# Altium PCB STM32H743I-EVAL2PCBDESIGN.PcbDoc (part 18 of 23)
Units mil, origin at the board's own origin, x right, y up, seen from the top; angles counter-clockwise.
Board outline 6558 x 5417 mil, 8 copper layers (L1_TOP, L2_GND, L3_HS1, L4_POWER, L5_SIG, L6_HS2, L7_GND, L8_BOTTOM), stack 61.368 mil thick; 620 components, 588 nets, 2945 pads, 1724 vias.
Unrouted connection lines stored in the file: 1.
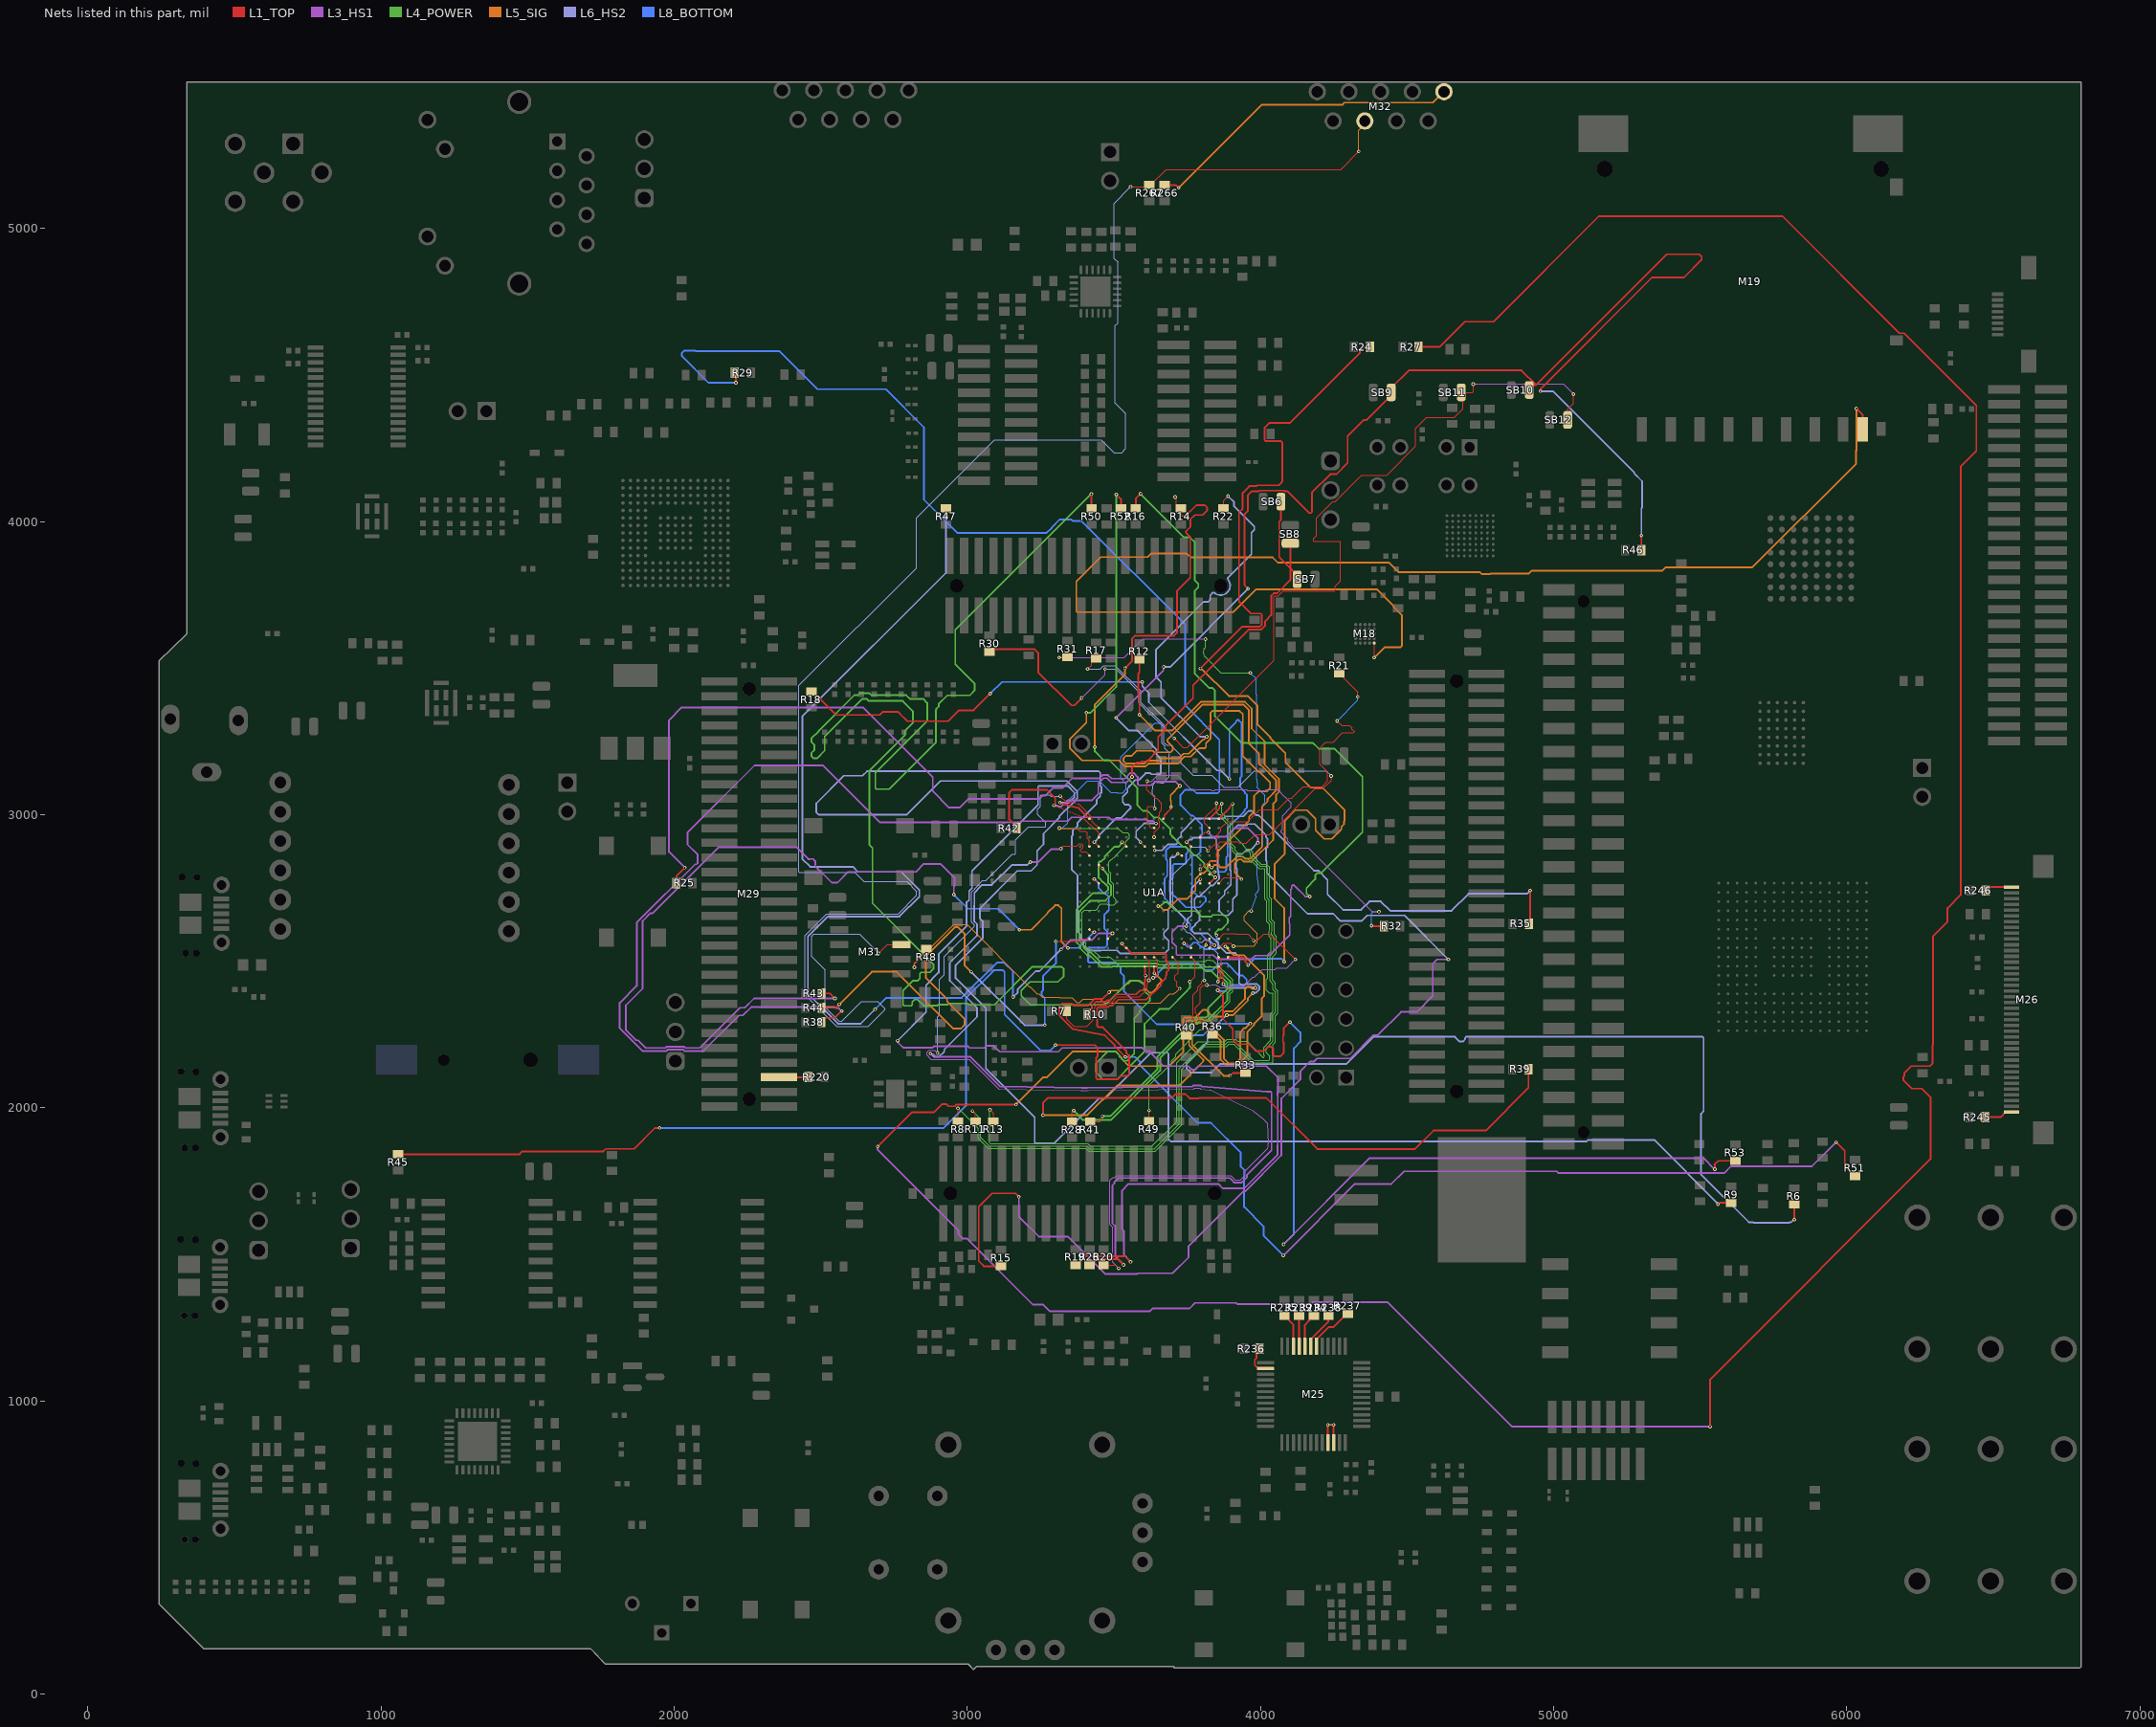
[diagram p15: the nets of this part, all layers, seen from the top]

## Via types
v1: diameter 12, hole 6, L1_TOP to L8_BOTTOM, tented both sides, 1724 vias

## Nets (pads, with @x,y where several pads share a name; then routed paths per layer and width w, separated by ;. In a path a pad name is that pad's centre, name@x,y a point inside that pad or via, vN(x,y) a via of type N, cw(c..) or ccw(c..) an arc to the next point about the centre after c; other vN are vias at no path point) (continued)
NetM18_E5: M18.E5 M19.8 | length 4704.1
  L1_TOP w2: v1(4388,3536) M18.E5@4388,3585.5
  L1_TOP w6: v1(6033,4386) 6054.27,4364.73 M19.8@6054.27,4314.24
  L5_SIG w6: v1(4388,3536) 4423,3571 4477.14,3571 4483,3576.86 4483,3680.33 4454.33,3709 4454.33,3712.19 4397.53,3769 3985,3769 3907,3691 3375.51,3691 3372,3694.51 3372,3795.85 3455.15,3879 3614.28,3879 3626.28,3891 3749,3891 3762,3878 4041.72,3878 4059.72,3860 4439.1,3860 4472.1,3827 4719.62,3827 4720.62,3828 4748.07,3828 4755.07,3821 4782.53,3821 4784.53,3823 4915.62,3823 4924.62,3832 5370.28,3832 5382.28,3844 5678.14,3844 6032,4197.86 6032,4241.62 6033,4242.62 v1(6033,4386)
NetM25_2: M25.2 R236.2 | length 104.1
  L1_TOP w6: R236.2@3997.56,1178 3986.78,1167.22 3986.78,1145.79 3980.67,1139.68 3980.67,1122.19 3990.24,1112.62 4014.49,1112.62 M25.2@4017,1110.11
NetM25_21: M25.21 M25.22 | length 139.1
  L1_TOP w6: M25.21@4229.89,857.85 v1(4229.89,917.56) ; M25.22@4249.58,857.85 v1(4249.58,917.56)
  L5_SIG w6: v1(4229.89,917.56) v1(4249.58,917.56)
NetM25_42: M25.42 R237.2 | length 168.5
  L1_TOP w6: M25.42@4192,1184.72 M25.42@4191.02,1185.7 4191.02,1209.52 4198.19,1216.69 4198.19,1217.12 4232.46,1251.39 4249.01,1251.39 4294.06,1296.44 R237.2@4298,1296.44
NetM25_43: M25.43 R238.2 | length 128.9
  L1_TOP w6: M25.43@4171.33,1185.7 4171.33,1209.52 4178.5,1216.69 4178.5,1217.12 4231.56,1270.18 4231.56,1289 R238.2@4232,1289.44
NetM25_44: M25.44 R234.2 | length 118.6
  L1_TOP w6: M25.44@4151.65,1185.7 4151.65,1259.09 4167.28,1274.72 4167.28,1278.66 4178.06,1289.44 R234.2@4182,1289.44
NetM25_45: M25.45 R239.2 | length 103.8
  L1_TOP w6: M25.45@4131.96,1185.7 R239.2@4132,1289.44 R239.2@4132,1289.44
NetM25_46: M25.46 R235.2 | length 118.6
  L1_TOP w6: R235.2@4082,1289.44 4085.94,1289.44 4096.72,1278.66 4096.72,1274.72 4112.28,1259.17 M25.46@4112.28,1185.7
NetM26_1: M26.1 R245.2 | length 96.7
  L1_TOP w6: R245.2@6472.56,1968 6525.28,1968 6542.42,1985.14 M26.1@6562.11,1985.14
NetM26_40: M26.40 R246.1 | length 92.1
  L1_TOP w6: R246.1@6475.56,2741 6475.56,2742.08 6486.34,2752.86 M26.40@6562.11,2752.86
NetM29_05: M29.05 R220.2 | length 100.4
  L1_TOP w6: M29.05@2357.5,2104 2456.44,2104 R220.2@2457.44,2105
NetM31_7: M31.7 M32.7 R267.2 | length 6401.5
  L1_TOP w4: v1(2697,2527) 2727,2557 M31.7@2775.3,2557 ; v1(3557,5142) 3614.44,5142 R267.2@3621,5148.56 3624.94,5148.56 3678.29,5201.91 4273.91,5201.91 v1(4335.31,5263.31)
  L5_SIG w4: v1(4335.31,5263.31) 4335.31,5334.41 4355.98,5355.08 M32.7@4355.98,5367
  L6_HS2 w4: v1(2697,2527) 2632,2592 2476.03,2592 2469,2584.97 2469,2515.97 2515.51,2469.46 2515.51,2342.51 2562.03,2296 2571.97,2296 2638.97,2363 2694.73,2363 2719,2338.73 2719,2335.41 2661.59,2278 2554.57,2278 2447,2385.57 2447,2588.43 2520.23,2661.66 2764.65,2661.66 2827.34,2724.35 2827.34,2738.43 2793.88,2771.89 2647,2771.89 2615.89,2803 2427.34,2803 2425,2805.34 2425,3441 2826,3842 2826,4012.67 3092.33,4279 3456,4279 3500,4235 3526.31,4235 3540,4248.69 3540,4369.31 3504,4405.31 3504,4668.66 3513,4677.66 3513,4885.28 3500,4898.28 3500,5085 v1(3557,5142)
NetM32_5: M32.5 R266.2 | length 1092.9
  L1_TOP w6: R266.2@3673,5148.56 3711.44,5148.56 v1(3721,5139)
  L5_SIG w6: v1(3721,5139) 4004,5422 4278.94,5422 4286.44,5429.5 4588.56,5429.5 M32.5@4626.06,5467
NetR6_1: R6.1 U1A.D13 | length 4025.8
  L1_TOP w2: v1(3748.03,2906.46) U1A.D13@3763,2891.49
  L1_TOP w6: v1(5821,1618) R6.1@5821,1669.88
  L5_SIG w6: v1(3885,2316) 3906.76,2316 3957,2366.24 3957,2374 v1(3974,2391)
  L6_HS2 w6: v1(3748.03,2906.46) 3749.65,2906.46 3758.65,2915.46 3765.6,2915.46 3772.14,2922 3842.38,2922 3850,2914.38 3850,2884.31 3853.96,2880.35 3853.96,2812.42 3856.48,2809.9 3856.48,2793.9 3859,2791.38 3859,2780.62 3836.38,2758 3829.62,2758 3792.5,2720.88 3783.5,2720.88 3775,2712.38 3775,2681.47 3792,2664.47 3792,2640.62 3777.62,2626.23 3777.62,2624 3767,2613.38 3767,2602.62 3774.62,2595 3820.38,2595 3856,2559.38 3856,2555.62 3883.62,2528 3914.33,2528 3928,2514.33 3928,2444.62 3927,2443.62 3927,2426.62 3934.62,2419 3947.06,2419 3950.06,2422 3988.38,2422 3996,2414.38 3996,2403.62 3984.53,2392.15 3975.15,2392.15 v1(3974,2391) ; v1(3885,2316) 3819,2250 3819,2223.53 3748,2152.53 3748,2133.47 3761.47,2120 3832.96,2120 3861.96,2149 3894.62,2149 4293,2149 4386,2242 4663.62,2242 4679.62,2226 4690.38,2226 4698,2233.62 4698,2238.49 4701.51,2242 5508.49,2242 5512,2238.49 5512,1988.14 5503,1979.14 5503,1772.14 5666.14,1609 5680.86,1609 5681.86,1608 5802.77,1608 5803.77,1609 5810.38,1609 5819.38,1618 v1(5821,1618)
NetR7_2: R7.2 U1A.T8 | length 515.4
  L1_TOP w4: R7.2@3339.56,2330 3339.56,2301.44 3363,2278 3407.42,2278 3428.22,2298.8 3428.22,2329.99 3433.78,2335.55 3433.78,2343.34 3443.15,2352.72 3468.61,2352.72 3476.87,2352.72 3482.15,2358 3490.11,2358 3510.11,2378 3587.11,2378 3613,2403.89 3613,2422.97 3622.01,2431.99 3625.03,2435 ; U1A.T8@3605.52,2513.54 3621.56,2497.5 3621.56,2468.61 3622,2468.17 3622,2438.03 3625.03,2435 ; v1(3619,2435) 3625.03,2435
NetR8_1: R8.1 U1A.A16 | length 2540.8
  L1_TOP w4: R8.1@2968,1953.56 v1(2968,1998)
  L1_TOP w6: U1A.A16@3857.49,2985.98 3894.03,3022.52 3894.03,3026.03 v1(3905,3037)
  L4_POWER w4: v1(2968,1998) 3036.66,1929.34 3036.66,1895.34 3071,1861 3404.04,1861 3413.38,1851.66 3640.94,1851.66 3731,1941.72 3731,2131.28 3808.72,2209 3884.57,2209 3892.57,2217 3908.31,2217 3972.31,2153 4040,2153 4043.41,2156.41 4043.41,2215.81 4051,2223.4 4051,2313.71 4059.15,2321.86 4059.15,2398.17 4051.15,2406.17 4051.15,2425.15 4041,2435.3 4041,2514.57 4054.5,2528.07 4054.5,2585.01 4048,2591.52 4048,2631.74 4038,2641.74 4038,2711.78 4031,2718.78 4031,2820.72 4020.06,2831.66 4002.31,2831.66 3974,2859.97 3974,2871.28 3962.28,2883 3952.03,2883 3940.78,2894.25 3940.78,2896.23 3905,2932.01 3905,2943.92 3906,2944.92 3906,2973.08 3905,2974.08 v1(3905,3037)
NetR9_1: R9.1 U1A.E12 | length 7750.2
  L1_TOP w4: v1(3718,2867) 3719.53,2865.47 3724.71,2865.47 3730.19,2859.99 U1A.E12@3731.5,2859.99
  L1_TOP w6: v1(5561,1671) 5562.62,1671 5567.51,1675.88 R9.1@5606,1675.88
  L6_HS2 w6: v1(3718,2867) 3706.12,2855.12 3697.21,2855.12 3692.04,2849.94 3692.04,2684.65 3685,2677.62 3685,2612.45 3670.48,2597.93 3670.48,2586.11 3687.01,2569.58 3687.01,2540.99 3673.02,2527 3520.28,2527 3510.28,2537 3455.09,2537 3454.09,2536 3413.86,2536 3396,2553.86 3396,2566.95 3386.05,2576.91 3386.05,2590.31 3376,2600.36 3376,2792.53 3356.51,2812.01 3356.51,2927.32 3360,2930.81 3360,2946.14 3376,2962.14 3376,2972.28 3441,3037.28 3441,3050.47 3453.51,3062.99 3453.51,3071.99 3457,3075.47 3457,3094.53 3453.51,3098.01 3453.51,3142.97 3448.09,3148.4 2658.12,3148.4 2642.72,3133 2579,3133 2485,3039 2485,3007.62 2492.62,3000 2793.84,3000 2908.84,3115 3339.14,3115 3365,3089.14 3375,3079.14 3375,3055.47 3365,3045.47 3313.62,2994.09 3313.62,2989 3260,2935.39 3260,2898.81 3238,2876.81 3238,2828.47 3217.53,2808 3170.19,2808 3043,2680.81 3043,2645.19 3053,2635.19 3053,2578.95 2960,2485.95 2960,2442.05 3063,2339.05 3063,2134 3229.51,1967.49 3229.51,1878.99 3296.99,1878.99 3449,2031 3469.47,2031 3626.47,2188 3682.49,2188 3686,2184.49 3686,1893.51 3694.51,1885 5112.4,1885 5117.48,1890.08 5343.06,1890.08 5561,1672.14 v1(5561,1671)
NetR10_2: R10.2 U1A.U8 | length 316.2
  L1_TOP w6: R10.2@3408.44,2319 3408.44,2322.94 3424.78,2339.28 3424.78,2347.07 3439.42,2361.72 3464.88,2361.72 3473.14,2361.72 3478.43,2367 3486.38,2367 3506.38,2387 3576.38,2387 3589.38,2400 3596.38,2400 3604,2407.62 3604,2427.38 3606,2429.38 3606,2440.38 3606.85,2441.24 3606.85,2449.85 v1(3608,2451) 3608,2452.62 3605.52,2455.1 U1A.U8@3605.52,2482.04
NetR11_1: R11.1 U1A.A15 | length 2526
  L1_TOP w4: v1(3018,1989) 3028,1979 R11.1@3028,1953.56
  L1_TOP w6: U1A.A15@3825.99,2985.98 3859.85,3019.84 3859.85,3029.23 v1(3868,3037.38)
  L4_POWER w4: v1(3018,1989) 3046,1961 3046,1900 3044.66,1898.66 3074.31,1869 3407.36,1869 3416.01,1860.34 3638.31,1860.34 3723,1945.03 3723,2134.6 3805.4,2217 3881.26,2217 3889.26,2225 3911.63,2225 3975.63,2161 4028.69,2161 4031.03,2163.34 4031.03,2175.64 4019,2187.67 4019,2202.72 4043,2226.72 4043,2317.02 4051.15,2325.17 4051.15,2394.85 4043.15,2402.85 4043.15,2421.83 4033,2431.98 4033,2517.88 4046.5,2531.38 4046.5,2581.7 4038,2590.2 4038,2599.57 4040,2601.57 4040,2628.43 4030,2638.43 4030,2708.47 4023,2715.47 4023,2817.4 4016.75,2823.66 3999,2823.66 3966,2856.66 3966,2867.97 3958.97,2875 3946.14,2875 3938.13,2866.99 3925.29,2866.99 3914.01,2878.28 3914.01,2888.56 3898.03,2904.53 3898.03,2923.31 3897,2924.34 3897,2947.23 3898,2948.23 3898,2969.77 3881.5,2986.27 3881.5,2992.77 3868,3006.27 v1(3868,3037.38)
NetR12_2: R12.2 U1A.H16 | length 1463.3
  L1_TOP w4: U1A.H16@3857.49,2765.5 3876.49,2784.51 3928.33,2784.51 3932.84,2780 v1(3935,2780)
  L1_TOP w6: v1(3587,3341) 3587,3409.88 3583,3413.88 3583,3481.14 3587,3485.14 R12.2@3587,3529.44
  L5_SIG w6: v1(3587,3341) 3641,3287 3698.86,3287 3796.86,3385 3947.14,3385 3970,3362.14 3970,3293.76 4014,3249.76 4014,3170.95 4063,3121.95 4063,3078.05 4053,3068.05 4053,3046.38 4043,3036.38 4043,2913.3 3969.7,2840 3942.38,2840 3935.38,2847 3924.62,2847 3912.22,2834.61 3912.22,2802.78 v1(3935,2780)
NetR13_1: R13.1 U1A.B15 | length 2515.1
  L1_TOP w4: v1(3077,1993) 3089,1981 R13.1@3089,1953.56 ; U1A.B15@3825.99,2954.48 3809.95,2970.52 3809.95,2988.71 3848.47,3027.22 3848.47,3037.47 v1(3850,3039)
  L4_POWER w4: v1(3077,1993) 3077,1880 3080,1877 3410.67,1877 3418.67,1869 3630,1869 3714,1953 3714,2153 3786,2225 3877.95,2225 3885.95,2233 3915.69,2233 3921.69,2227 3954.97,2227 4000.33,2181.64 4000.33,2179.36 4007.69,2172 4011,2172 4013.34,2174.34 4013.34,2177.66 4011,2180 4011,2206.03 4035,2230.03 4035,2320.34 4043.15,2328.49 4043.15,2389.19 4040.8,2391.54 4029.49,2391.54 4019.15,2401.88 4019.15,2438.01 4024,2442.87 4024,2522.63 4036,2534.63 4036,2578.25 4030,2584.26 4030,2602.89 4032,2604.89 4032,2625.11 4022,2635.11 4022,2705.16 4015,2712.16 4015,2813.31 4012.66,2815.66 3995.69,2815.66 3972.34,2839 3967.11,2839 3955.11,2851 3949.03,2851 3944.03,2856 3935.76,2856 3932.76,2858.99 3921.98,2858.99 3906.01,2874.96 3906.01,2885.25 3890.03,2901.22 3890.03,2919.99 3889,2921.03 3889,2950.54 3890,2951.54 3890,2966.46 3873.5,2982.96 3873.5,2989.46 3862.96,3000 3856.46,3000 3850,3006.46 v1(3850,3039)
NetR14_2: R14.2 U1A.H15 | length 1947
  L1_TOP w4: v1(3709,4084) 3709,4081.84 3712.28,4078.55 3712.28,4057.34 3724.06,4045.56 R14.2@3728,4045.56
  L1_TOP w6: v1(3537.82,3499.82) 3562.28,3524.28 3562.28,3601.24 3571.96,3610.92 3705.32,3610.92 3715,3620.6 3715,3763.38 3760,3808.38 3760,3947.42 3746.82,3960.59 3746.82,3967.87 3761,3982.05 3761,4007.38 3776.12,4022.5 3802.88,4022.5 3818,4037.62 3818,4048.38 3810.38,4056 3781.33,4056 3744.6,4019.26 3731.51,4019.26 3728,4022.78 R14.2@3728,4045.56 ; U1A.H15@3825.99,2765.5 3825.99,2765.75 3846,2785.76 v1(3846,2786)
  L4_POWER w6: v1(3434.78,3230.81) 3434.81,3215.81 3464.58,3186.03 3484.35,3186.03 3580,3090.38 3580,3031.86 3598.86,3013 3614.84,3013 3636.84,2991 3652.7,2991 3693,2950.7 3693,2932.62 3735.62,2890 3745.5,2890 3773.54,2861.96 3779.42,2861.96 3808.52,2832.86 3808.52,2822.72 3830,2801.24 3830,2799.62 3837.62,2792 3839.49,2792 3845.49,2786 v1(3846,2786)
  L5_SIG w6: v1(3434.78,3230.81) 3434.78,3375.78 3537.82,3478.82 v1(3537.82,3499.82)
NetR15_1: R15.1 U1A.C14 | length 4629.7
  L1_TOP w2: U1A.C14@3794.5,2922.98 3811.51,2940 v1(3822,2940)
  L1_TOP w6: R15.1@3115,1459.44 3056.41,1459.44 3039,1476.85 3039,1662.41 3084.59,1708 3164,1708 v1(3176,1696)
  L3_HS1 w6: v1(3176,1696) 3176,1628 3243.52,1560.48 3342.52,1560.48 3470,1433 3580.29,1433 3582.29,1435 3700,1435 3755,1490 3755,1528.38 3941.62,1715 3948.27,1715 4071.25,1837.98 4071.25,2031.75 4137,2097.5 4137,2125.78 4169.22,2158 4183.36,2158 4193.36,2168 4306.5,2168 4386,2247.5 4400.02,2247.5 4479.52,2327 4533.38,2327 4588,2381.62 4588,2491.38 4602.44,2505.83 v1(4641,2505.83) ; v1(3822,2940) 3822,2938.53 3835.58,2924.95 3881.94,2924.95 3910.81,2953.83 3957.17,2953.83 3991,2920 v1(3991,2904)
  L6_HS2 w6: v1(3991,2904) 3965.73,2878.73 3951.11,2878.73 3938.38,2865.99 3920.51,2865.99 3917,2862.48 3917,2818.24 3919,2816.24 3919,2725.03 3905.78,2711.81 3905.78,2672.64 3889.14,2656 3874.95,2656 3859,2671.95 3859,2708.19 3878,2727.19 3878,2739 3899,2760 3899,2807.95 3897,2809.95 3897,2938.48 3922.51,2963.99 3953.24,2963.99 3957.25,2968 3981.14,2968 4019,2930.14 4019,2922.67 4024,2917.67 4024,2890.33 4019,2885.33 4019,2842.47 4021.37,2840.1 4021.37,2801.1 4160.47,2662 4247.72,2662 4271.72,2638 4346.28,2638 4364.28,2656 4490.83,2656 v1(4641,2505.83)
NetR16_2: R16.2 U1A.H14 | length 3048.8
  L1_TOP w2: U1A.H14@3794.5,2765.5 3794.75,2765.76 3794.75,2778.75 v1(3795,2779)
  L1_TOP w6: R16.2@3574,4045.56 3575,4046.56 3575,4079 v1(3591,4095)
  L3_HS1 w6: v1(3747,2619) 3717.62,2619 3698,2599.38 3698,2565.42 3713.01,2550.42 3713.01,2524.51 3716.52,2521 3838.64,2521 3852.64,2507 3969.81,2507 3981.81,2519 4030,2519 4100,2589 4100,2627.47 4098,2629.47 4098,2648.53 4103,2653.53 4103,2744.38 4106.14,2747.53 4106.14,2755.86 4109.66,2759.37 4114.63,2759.37 4153.35,2720.65 v1(4168.35,2720.65)
  L4_POWER w6: v1(3591,4095) 3739.54,3946.46 3759.04,3946.46 3776,3929.5 3776,3798.89 3788,3786.89 3788,3776.12 3776,3764.12 3776,3481 3825,3432 3836.38,3432 3844,3424.38 3844,3336.62 3935.62,3245 4178.86,3245 4198.52,3225.33 4252.19,3225.33 4348,3129.53 4348,2941 4208,2801 4194.62,2801 4187,2793.38 4187,2780 4157,2750 4157,2732 v1(4168.35,2720.65)
  L6_HS2 w6: v1(3747,2619) 3748.15,2620.15 3748.15,2627.45 3751,2630.3 3751,2642.61 3765,2656.62 3765,2749 v1(3795,2779)
NetR17_2: R17.2 U1A.G14 | length 1803.3
  L1_TOP w2: v1(3410,3497) 3423.28,3510.28 3423.28,3519.66 3436.06,3532.44 R17.2@3440,3532.44 ; U1A.G14@3794.5,2797 3794.75,2797.25 3794.75,2813.75 v1(3795,2814) 3795.56,2814 3803.04,2821.48 3803.62,2822.07 3831.35,2840.11 3831.84,2840.43 3832.52,2840.43 3849.88,2839.03 3850.79,2839.03 3851.37,2839.62 3851.96,2840.2 3851.96,2853.18 3850.49,2854.66 3850.49,2868.93 3851.96,2870.4 3851.96,2881.04 3848,2885 3848,2891.9 3863.59,2907.49 3924.48,2907.49 3928.97,2903 3952.04,2903 3981.87,2932.83 4030.9,2932.83 4187.07,3089 4213.15,3089 4241,3116.85 v1(4241,3132.19)
  L6_HS2 w2: v1(3410,3497) 3453.17,3497 3464.17,3508 3504.63,3508 3591.53,3421.1 3591.53,3382.91 3625.95,3348.49 3628.55,3348.49 3671,3306.04 3671,3246 3680,3237 3692.56,3237 3728.53,3201.03 3728.53,3175.91 3769.99,3134.46 3833.54,3134.46 3875,3093 3923.11,3093 3979.11,3149 4224.19,3149 v1(4241,3132.19)
NetR18_2: R18.2 U1A.G15 | length 2534.2
  L1_TOP w2: U1A.G15@3825.99,2797 3833.99,2805 v1(3843,2805)
  L1_TOP w6: R18.2@2468,3420.56 2471.94,3420.56 2552.18,3340.31 2701.42,3340.31 2712.11,3351 2762.62,3351 2781.62,3332 2782,3332 2795,3319 2934.38,3319 2971.55,3356.17 3021.17,3356.17 v1(3078,3413)
  L6_HS2 w6: v1(3596,3453) 3597,3452 3597,3438 3619,3416 3619,3383.38 3851.38,3151 3865,3151 v1(3894,3122)
  L8_BOTTOM w6: v1(3078,3413) 3118,3453 v1(3596,3453) ; v1(3843,2805) 3877.3,2805 3883.12,2810.83 3883.12,2814.41 3883,2814.53 3883,2853.47 3887.78,2858.25 3887.78,2954.47 3946.01,3012.69 3946.01,3016.99 3954.01,3024.99 3954.01,3066.9 3947,3073.9 3947,3077.65 3930.81,3093.85 3930.81,3126.15 3936,3131.35 3936,3312.38 3925.49,3322.9 3920.51,3322.9 3917,3319.38 3917,3316.38 3894,3293.38 v1(3894,3122)
NetR19_1: R19.1 U1A.A2 | length 4097.6
  L1_TOP w6: v1(3316,3041) 3333.3,3034 3379.52,3023 3380.62,3021.9 U1A.A2@3416.54,2985.98 ; R19.1@3369,1462.44 3372.94,1462.44 3403.72,1493.22 3537.78,1493.22 v1(3557,1474)
  L3_HS1 w6: v1(2762,2229) 2763.15,2227.85 2763.15,2222.85 2771.26,2214.74 2781,2205 2881.81,2205 2886.81,2210 3001.76,2210 3007.76,2204 3057.67,2204 3064.67,2211 3090,2211 3110,2191 3310.53,2191 3323.53,2204 3502.75,2204 3503.75,2205 3595.19,2205 3607.19,2193 3620.53,2193 3658,2155.53 3658,2153.28 3669.28,2142 3753.62,2142 3765.62,2130 3776.38,2130 3788.38,2142 4020.14,2142 4060,2102.14 4060,2054.33 4058,2052.33 4058,2043.6 4059,2042.6 4059,1871.4 4058,1870.4 4058,1838.88 3944.12,1725 3871.35,1725 3856.43,1739.92 3550.31,1739.92 3528,1717.61 3528,1586 3534.43,1579.57 3534.43,1496.57 v1(3557,1474)
  L6_HS2 w6: v1(2762,2229) 2859,2326 2859,2418.62 2902,2461.62 2902,2523.62 2997,2618.62 2997,2699.86 3006,2708.86 3006,2739.98 3016,2749.98 3016,2807.7 3241,3032.7 3241,3094.49 3244.51,3098 3342,3098 3365,3075 3365,3059.62 3346.38,3041 v1(3316,3041)
NetR20_1: R20.1 U1A.B3 | length 3707.5
  L1_TOP w4: v1(3317,3063) 3337.03,3043 3346.97,3043 3353.06,3043.9 3355.33,3043.91 3377.81,3036.8 cw(c3376.61,3032.98) 3379.41,3035.83 ; 3379.44,3035.81 3425.54,2989.7 3425.54,2976.98 U1A.B3@3448.04,2954.48 ; R20.1@3465,1462.44 3505.56,1462.44 v1(3516,1452)
  L3_HS1 w4: v1(2898,2187) 2889,2196 2869.03,2196 2862,2188.97 2862,2179.03 2876.03,2165 3005.75,2165 3092.73,2078.01 3106.75,2064 3385.75,2059 3412.25,2059 3771.89,2064 3774.89,2067 3793.11,2067 3796.11,2064 3827.73,2061 3829.73,2060.67 3973.7,1990.98 3975.67,1989.42 4010.25,1960.14 4023.14,1947.25 4026,1877.7 4026,1865.27 4024.83,1860.86 3945,1781.03 3945,1766.89 3932.11,1754 3913.89,1754 3898.97,1768.92 3511.05,1768.92 3503.13,1761 3495.34,1761 3486,1751.66 3486,1601.13 3496,1591.13 3496,1472.73 3516,1452.73 v1(3516,1452)
  L6_HS2 w4: v1(2898,2187) 2898,2309.96 2905,2316.96 2905,2437.75 2921,2453.75 2921,2515.75 3024,2618.75 3024,2623.18 3014,2633.18 3014,2704.14 3015,2705.14 3015,2736.26 3025,2746.25 3025,2748.25 3051.75,2775 3062.97,2775 3152.97,2865 3162.66,2865 3165,2867.34 3165,2914.97 3208.03,2958 3265.03,2958 3267,2959.97 3267,2972.33 3239,3000.33 3239,3017.97 3250,3028.97 3250,3064.66 3252.34,3067 3281.59,3067 3285.59,3063 v1(3317,3063)
NetR21_1: R21.1 U1A.U16 | length 1795
  L1_TOP w4: v1(3821.16,2877) 3828.22,2884.06 3829.07,2884.06 3849.49,2904.48 3849.49,2929.51 3865.49,2945.51 3865.49,2955.03 3887.44,2976.98 3956.71,2976.98 3996.73,3017 4059.03,3017 4098.53,3056.5 4105.5,3056.5 4145,3096 4210.25,3096 4229,3114.75 4229,3145.91 4203,3171.91 4203,3228.09 4222.76,3247.85 4248.78,3247.85 4279.93,3279 4317,3279 4319.34,3281.34 4319.34,3284.66 4312,3292 4312,3295.97 4304.37,3303.6 4277.4,3303.6 v1(4261.33,3319.67) ; R21.1@4269,3481.44 4272.94,3481.44 4284.72,3469.66 4284.72,3465.72 4332,3418.44 v1(4332,3402)
  L1_TOP w6: v1(3855,2430) 3855,2431.62 3857.49,2434.11 3857.49,2436.73 3863.72,2442.96 3863.72,2457.04 3857.49,2463.27 U1A.U16@3857.49,2482.04
  L6_HS2 w4: v1(3821.16,2877) 3814.03,2884.14 3814.03,2886.17 3811.2,2889 3764.34,2889 3762,2886.66 3762,2854.44 3702,2794.44 3702,2687.03 3742,2647.03 3742,2634.03 3739.15,2631.18 3735,2627.03 3735,2614.03 3751.27,2597.76 3758.73,2597.76 3775,2581.5 3775,2579.05 3789.53,2564.53 3800.68,2564.53 3808.5,2572.34 3819.66,2572.34 3831,2561 3831,2549.03 3855,2525.03 v1(3855,2430)
  L8_BOTTOM w4: v1(4261.33,3319.67) 4332,3390.34 v1(4332,3402)
NetR22_2: R22.2 U1A.F15 | length 2825.6
  L1_TOP w2: U1A.F15@3825.99,2828.5 3825.99,2827.75 3833,2820.74 v1(3833,2820)
  L1_TOP w4: R22.2@3874,4045.56 3874,4072 v1(3889,4087)
  L5_SIG w6: v1(3817,3266) 3806.39,3255.39 3802.15,3255.39 3754.76,3208 3737.19,3208 3722.19,3193 3661.43,3193 3652.43,3184 3613.53,3184 3604.53,3175 3540.62,3175 3533,3182.62 3533,3193.38 3540.62,3201 3560.62,3201 3577.62,3218 3633,3218 3638,3213 3693.38,3213 3701,3220.62 3701,3231.38 3681.68,3250.71 3681.68,3255.68 3801,3375 3943,3375 3960,3358 3960,3243.67 3994,3209.67 3994,3173.49 3997.7,3169.79 4001.02,3169.79 4053,3117.81 4053,3082.19 4027.81,3057 4027.51,3057 4024,3053.49 4024,3045.62 4005,3026.62 4005,2889.45 3965.55,2850 3946.53,2850 3939.53,2857 3919.7,2857 3883.16,2820.46 3862.66,2820.46 3855.13,2828 3842.62,2828 3834.62,2820 v1(3833,2820)
  L6_HS2 w6: v1(3817,3266) 3794,3266 3660.51,3399.49 3660.51,3452.21 3644,3468.73 3644,3564 3806.29,3726.29 3810.33,3726.29 3810.62,3726 3821.38,3726 3829,3733.62 3829,3744.38 3828.71,3744.67 3828.71,3748.71 3837.5,3757.5 3839.99,3757.5 3842.2,3757.5 ccw(c3864,3781.5) 3892.66,3796.67 3888.5,3804.53 3888.5,3808.5 3969,3889 3969,3962.62 3979,3972.62 3979,3983.38 3909.86,4052.52 3909.86,4066.14 v1(3889,4087)
NetR24_1: R24.1 U1A.T17 | length 3482.6
  L1_TOP w6: v1(3795,3499) 3937.22,3641.22 3997.06,3641.22 4004.72,3648.88 4004.72,3682.24 4000.62,3686.34 3967.26,3686.34 3927,3726.6 3927,4031.71 3939.31,4044.02 3939.31,4098.15 3962.16,4121 3986.04,4121 3989.04,4124 4062.14,4124 4073,4134.86 4073,4136.27 4074,4137.27 4074,4270.77 4070.49,4274.28 4017.88,4274.28 4013.78,4278.38 4013.78,4319.62 4031.16,4337 4100.84,4337 4339.22,4575.38 4339.22,4583.22 4352,4596 R24.1@4373.56,4596 ; U1A.T17@3888.98,2513.54 3939.46,2513.54 3949.27,2503.73 3949.27,2497.35 3958,2488.62 v1(3958,2487)
  L5_SIG w6: v1(3795,3499) 3796.62,3499 3799.62,3496 3801.14,3496 3892.14,3405 3951,3405 3956.14,3405 3990,3371.14 3990,3366 3990,3307.14 4034,3263.14 4034,3260 4085,3209 4085,3178.33 4170.33,3093 4210,3093 4286.22,3016.78 4286.22,2977.95 4284.54,2976.28 4284.54,2967.28 4276.22,2958.95 4276.22,2950.17 4243.37,2917.33 4216.91,2917.33 4187.79,2946.45 4187.79,2986.63 4159.09,3015.33 4118.49,3015.33 4083,2979.85 4083,2866.14 4048,2831.14 4048,2714.15 4081,2681.15 v1(4081,2498)
  L8_BOTTOM w6: v1(3958,2487) 3980,2509 4070,2509 v1(4081,2498)
NetR25_2: R25.2 U1A.A10 | length 2758.5
  L1_TOP w6: R25.2@2007.44,2767 2007.44,2790.44 v1(2036,2819) ; U1A.A10@3668.51,2985.98 3672.01,2989.47 3672.01,2997.57 3693.85,3019.42 3693.85,3025.85 v1(3695,3027)
  L3_HS1 w6: v1(2036,2819) 1982,2873 1982,3322.38 2025.62,3366 2643.86,3366 2882,3127.86 2882,3080.19 2938.19,3024 2973.81,3024 3003.81,3054 3245.33,3054 3256.33,3065 3266.28,3065 3292.28,3091 3324.62,3091 3357.62,3124 3449.86,3124 3460.86,3135 3479.91,3135 3491.91,3123 3537.62,3123 3556.62,3142 3567.38,3142 3581,3128.38 3581,3104 3585,3100 3626.62,3100 3638.62,3112 3711,3112 v1(3725,3098)
  L5_SIG w6: v1(3695,3027) 3695,3046.39 3693.07,3048.31 3693.07,3066.07 v1(3725,3098)
NetR26_1: R26.1 U1A.E2 | length 3674.5
  L1_TOP w4: v1(3319,2884) 3327.66,2892.66 3373.49,2892.66 3381.31,2900.48 3388.77,2900.48 3394.04,2895.21 3394.04,2887.75 3385.94,2879.66 3385.94,2876.34 3388.29,2874 3404.97,2874 3412,2866.97 3412,2864.76 3416.54,2860.22 U1A.E2@3416.54,2859.99
  L1_TOP w6: R26.1@3417,1462.44 3420.94,1462.44 3441.5,1483 3444.47,1483 3444.69,1483.22 3513.78,1483.22 v1(3533,1464)
  L3_HS1 w6: v1(2874,2184) 2875,2183 2883.61,2183 2892.62,2174 3009.47,2174 3095.21,2088.27 3108.72,2074.76 3110.47,2073 3389.47,2068 3408.53,2068 3768.16,2073 3771.16,2076 3796.84,2076 3799.84,2073 4021.62,2055 4034.49,2055 4038,2051.49 4038,1855 3954,1771 3954,1763.16 3935.84,1745 3910.16,1745 3895.24,1759.92 3514.78,1759.92 3501.81,1746.95 3501.81,1742.33 3495,1735.52 3495,1604.86 3505,1594.86 3505,1492 v1(3533,1464) ; v1(3215,2838) 3241.62,2838 3285.62,2882 3304.57,2882 3305.42,2882.85 3317.85,2882.85 v1(3319,2884)
  L6_HS2 w6: v1(2874,2184) 2875.21,2184 2885.21,2174 2903.38,2174 2921,2191.62 2921,2198.38 3033,2310.38 3033,2340.76 2940,2433.76 2940,2494.24 3033,2587.24 3033,2626.9 3023,2636.9 3023,2689.1 3024,2690.1 3024,2732.53 3034,2742.53 3034,2744.53 3049.47,2760 3083.42,2760 3151.42,2828 3203.79,2828 3213.79,2838 v1(3215,2838)
NetR27_1: R27.1 U1A.T16 | length 11523.8
  L1_TOP w4: U1A.T16@3857.49,2513.54 3866.49,2504.54 3866.49,2467 3872.72,2460.77 3872.72,2454.17 3873.53,2453.36 v1(3873.53,2422.02)
  L1_TOP w6: v1(2694,1868) 2810.33,1984.33 2885.95,1984.33 2913.62,2012 2929.47,2012 2936.47,2005 2956.62,2005 2962.62,2011 v1(3166,2011) ; R27.1@4539.56,4596 4611.05,4596 4697.05,4682 4795,4682 5155,5042 5781,5042 6180.11,4642.89 6195.36,4642.89 6442.05,4396.2 6442.05,4241.05 6389,4188 6389,2726 6344,2681 6344,2634.67 6294,2584.67 6294,2216 6293.2,2215.2 6293.2,2152.19 6283.25,2142.24 6220.24,2142.24 6196.28,2118.28 6196.28,2108.67 6193,2105.38 6193,2094.62 6222.31,2065.31 6256.69,2065.31 6286,2036 6286,1824.86 5534,1072.86 v1(5534,911.54)
  L3_HS1 w6: v1(2694,1868) 2694,1857 2969,1582 2969,1568.47 2983.47,1554 2998,1554 3224,1328 3258.62,1328 3281.62,1305 3443.53,1305 3444.53,1306 3623,1306 3632,1315 3757.76,1315 3776.76,1334 3916.33,1334 3920.33,1330 4173.17,1330 4180.17,1337 4433,1337 4858.46,911.54 v1(5534,911.54)
  L5_SIG w6: v1(3166,2011) 3259,2104 3272.12,2104 3360.12,2192 3505.38,2192 3526,2171.38 3526,2167.62 3551.62,2142 3688.53,2142 3737,2190.47 3737,2304.49 3740.51,2308 3778.33,2308 3790.97,2320.64 3790.97,2321.36 3803.62,2334 3814.38,2334 3837.77,2310.62 3868.49,2310.62 3872,2314.13 3872,2321.38 3879.62,2329 3905.62,2329 3947,2370.39 3947,2404.38 3954.62,2412 3965.38,2412 3971.51,2405.87 3978.25,2405.87 3981.38,2409 v1(3983,2409)
  L6_HS2 w6: v1(3873.53,2422.02) 3886.54,2409 3951.2,2409 3954.2,2412 3966.38,2412 3968.23,2410.15 3981.85,2410.15 v1(3983,2409)
NetR28_1: R28.1 U1A.F3 | length 1770
  L1_TOP w2: U1A.F3@3448.04,2828.5 3448.27,2828.5 3460.77,2816 v1(3461,2816)
  L1_TOP w4: R28.1@3357,1952.56 3357,1984 v1(3363,1990)
  L4_POWER w6: v1(3363,1990) 3395,1958 3489.14,1958 3658,2126.86 3658,2169.38 3779.62,2291 3811.53,2291 3887,2366.47 3887,2391.7 3896.53,2401.23 3896.53,2431.54 3848.07,2480 3812.76,2480 3804.76,2488 3652.84,2488 3648.84,2492 3490.47,2492 3489.47,2491 3460.14,2491 3421.14,2530 3412.99,2530 3396,2546.99 3396,2555.14 3381.6,2569.55 3381.6,2669.22 3418.38,2706 3470.38,2706 3490,2725.62 3490,2758.53 3480,2768.53 3480,2793.95 3471.07,2802.87 3471.07,2804.86 3461,2814.94 v1(3461,2816)
NetR29_1: R29.1 U1A.R15 | length 4640.4
  L1_TOP w2: U1A.R15@3825.99,2545.03 3834,2553.04 3842.04,2553.04 v1(3843,2554)
  L1_TOP w6: R29.1@2206.44,4508 2210.48,4503.96 v1(2210.48,4473.96)
  L8_BOTTOM w6: v1(2210.48,4473.96) 2116.65,4473.96 2026,4564.62 2026,4575.38 2033.62,4583 2072,4583 2073,4582 2358.62,4582 2488.78,4451.83 2721.69,4451.83 2851.86,4321.67 2851.86,4075.11 2965.47,3961.5 3270.38,3961.5 3288,3979.11 3288,3980.02 3315.47,4007.5 3354.14,4007.5 3359.64,4002 3390.02,4002 3743.23,3648.79 3743.23,3372.3 3860,3255.53 3860,3079.47 3853.53,3073 3782.26,3073 3770.26,3085 3744.38,3085 3727,3067.62 3727,3032.62 3763.05,2996.56 3769.44,2996.56 3800,2966 3800,2946.38 3801,2945.38 3801,2934.62 3794.9,2928.52 3794.9,2898.48 3794.91,2871.95 3784.32,2861.37 3770.04,2861.37 3766.53,2857.86 3766.53,2741.95 3787.17,2721.31 3808.08,2721.31 3813,2716.38 3813,2704.38 3792.62,2684 3745.55,2684 3709.21,2720.34 3708.13,2720.34 3691,2737.47 3691,2774.53 3701,2784.53 3701,2827.16 3705.78,2831.94 3743.01,2831.94 3746.53,2835.46 3746.53,2866.14 3752,2871.62 3752,2882.38 3744.38,2890 3733.62,2890 3690.53,2890 3686.53,2886 3684.51,2886 3678,2879.49 3678,2847.37 3682.04,2843.33 3682.04,2791.02 3673,2781.98 3673,2714.38 3760,2627.38 3760,2609.62 3774.62,2595 3794.41,2595 3819.41,2570 3827,2570 v1(3843,2554)
NetR30_2: R30.2 U1A.B9 | length 1326.4
  L1_TOP w4: U1A.B9@3637.02,2954.48 3625.86,2954.48 3623.52,2956.82 3623.52,2961.94 3614.52,2970.94 3614.52,3025.41 3618.25,3029.13 3631.23,3029.13 v1(3639,3021.36)
  L1_TOP w6: R30.2@3076,3555.44 3084.78,3564.22 3229.62,3564.22 3241.82,3552.02 3241.82,3486.18 3355,3373 3365,3373 v1(3390,3398)
  L3_HS1 w2: v1(3390,3398) 3470,3478 v1(3470,3497)
  L6_HS2 w2: v1(3470,3497) 3507.15,3497 3585.53,3418.62 3585.53,3380.43 3623.47,3342.49 3626.06,3342.49 3664,3304.56 3664,3243.41 3673,3234.41 3673,3225.44 3686,3212.44 3687.65,3203.76 3687.65,3129.92 3671.04,3109.24 3669.87,3108.07 3669.8,3108 3658.35,3108 3645.61,3109.88 ccw(c3644,3099) 3633.03,3099.8 3631,3072.12 3631,3070.54 3631.59,3069.95 3639,3062.54 v1(3639,3021.36)
NetR31_1: R31.1 U1A.R16 | length 1938.7
  L1_TOP w2: v1(3313,3536) 3315.44,3538.44 R31.1@3342,3538.44
  L1_TOP w4: U1A.R16@3857.49,2545.03 3874.46,2562 3897,2562 v1(3908,2551)
  L3_HS1 w2: v1(3313,3536) 3535.7,3536 3598.7,3599 v1(3812,3599)
  L4_POWER w2: v1(3812,3599) 3812,3570.87 3808.59,3567.45 3808,3566.87 3806.08,3551.35 ccw(c3817,3550) 3806.42,3546.99 3808,3541.44 3808.59,3540.86 3865.36,3484.09 v1(3964.91,3484.09)
  L5_SIG w2: v1(3908,2551) 3978,2551 3983,2556 3983,2560.44 3988,2565.44 3988,2594.56 3944,2638.56 3944,2654.63 3961.54,2672.17 3967.51,2672.17 v1(3968.32,2671.37)
  L8_BOTTOM w2: v1(3964.91,3484.09) 3985,3464 3985,3410.16 3986.76,3408.4 3986.76,3119.92 3988.81,3117.87 3988.81,3109.38 3989,3095.05 3989,3091.3 4015,3065.3 4015,3040.75 4009,3034.75 4009,2893 3986.59,2870.59 3986,2870 3986,2868.34 3987.38,2796.42 ccw(c3998.37,2796.63) 3987.47,2795.19 3993.91,2746.44 cw(c3983,2745) 3990.78,2737.22 3985.41,2731.86 3985.11,2731.55 3983.94,2730.38 3982.51,2725.77 3982.52,2724.64 3985.23,2719.15 3985.23,2717.85 v1(3968.32,2671.37)
NetR32_2: R32.2 U1A.C9 | length 1451.8
  L1_TOP w2: v1(3613,3114) 3613,3099.09 3611,3097.09 3611,3085.89 3640.67,3056.22 3645.33,3056.22 3663,3038.56 3663,3028.99 3661.67,3027.67 3661.67,3018.11 3660,3016.43 3660,3012.67 3656.01,3008.67 3656.01,2999.7 3652.51,2996.2 3652.51,2978.69 3655,2976.2 3655,2958.69 3637.02,2940.71 v1(3637.02,2922.98)
  L1_TOP w6: v1(4379,2621) 4380,2620 R32.2@4421.44,2620
  L3_HS1 w2: v1(3613,3114) 3614,3113 3628.3,3113 3649.89,3134.59 3715.37,3134.59 3765.96,3084 3777.02,3084 3778.02,3085 3830,3085 3832,3083 3842.97,3083 3844.97,3085 3953.45,3085 3955.45,3083 4017.04,3083 4019.04,3085 4058.52,3085 4081.99,3061.52 4083.04,3061.52 4105,3039.56 4105,3026.49 4075,2996.49 4075,2949.7 4069.91,2944.61 4069.91,2939.64 4092.49,2917.06 4092.49,2908.58 4115.07,2886 4163.51,2886 4380.51,2669 v1(4404,2669)
  L8_BOTTOM w2: v1(4379,2621) 4379,2663 4385,2669 v1(4404,2669)
NetR33_1: R33.1 U1A.R17 | length 1089
  L1_TOP w6: v1(3880,2550) 3881.15,2548.85 3884.39,2548.85 3888.21,2545.03 U1A.R17@3888.98,2545.03 ; v1(3896,2109) 3905.44,2118.44 R33.1@3949,2118.44
  L5_SIG w6: v1(3880,2550) 3909.38,2520.62 3942.77,2520.62 4013,2450.38 4013,2381.62 4004,2372.62 4004,2311.37 3978,2285.37 3978,2281.62 3955,2258.62 3955,2178.47 3918.53,2142 3886.47,2142 3864.34,2164.13 3864.34,2228.66 3846,2247 3844.38,2247 3800.38,2291 3789.62,2291 3785.62,2287 3767.51,2287 3764,2283.49 3764,2264.62 3767,2261.62 3767,2215.86 3873.86,2109 v1(3896,2109)
NetR35_2: R35.2 U1A.D9 | length 1701.4
  L1_TOP w2: U1A.D9@3637.02,2891.49 v1(3639,2878)
  L1_TOP w6: R35.2@4915.56,2628 4920,2632.44 v1(4920,2741)
  L6_HS2 w6: v1(3639,2878) 3663.47,2878 3684.47,2899 3712.52,2899 3717.03,2903.51 3717.03,2915.87 3729,2927.84 3729,2938.87 3777.13,2987 3874.1,2987 3881.09,2993.99 3940.82,2993.99 3944.83,2998 3959.83,3013 3971.05,3013 3986.05,2998 3993.57,2998 4004.57,2987 4182.18,2809.38 4197,2809.38 4229,2777.38 4229,2728.24 4281.86,2675.38 4343.38,2675.38 4372,2704 4410.37,2704 4442.37,2672 4652,2672 4710,2730 4909,2730 v1(4920,2741)
NetR36_1: R36.1 U1A.P16 | length 893.7
  L1_TOP w4: v1(3817,2419) 3816.18,2418.18 3805,2418.18 3794.29,2407.47 3794.29,2357.88 3777.72,2341.3 3777.72,2323.55 3790,2311.26 3790,2301.26 3807,2284.26 3807,2276.5 3833.06,2250.44 R36.1@3837,2250.44 ; U1A.P16@3857.49,2576.53 3874.96,2594 3916.31,2594 3917.31,2593 3957.03,2593 3973,2577.03 3973,2576.16 3977,2572.16 v1(3977,2570) 3977.97,2570.97 3989,2570.97 4011.03,2593 4032,2593 v1(4119,2506)
  L3_HS1 w4: v1(3817,2419) 3818.03,2417.97 3831,2417.97 3833.03,2420 3848.03,2420 3853.02,2415.01 3856.96,2415.01 3861.95,2410.02 3889.76,2410.02 3894.75,2415 3943.75,2415 3973.75,2445 3979.32,2445 4006.32,2472 4050.22,2472 4054.22,2476 4090.11,2476 4108.11,2494 4107,2494 v1(4119,2506)
NetR38_2: R38.2 U1A.D8 | length 3677.2
  L1_TOP w2: v1(3590.55,2906.46) U1A.D8@3605.52,2891.49
  L1_TOP w6: R38.2@2502.56,2292 2502.56,2295.94 2513.34,2306.72 2547.33,2306.72 2570.62,2330 v1(2572,2330)
  L3_HS1 w6: v1(2572,2330) 2570.79,2330 2560.79,2340 2550.14,2340 2546.53,2343.62 2263,2343.62 2234.38,2315 2220.24,2315 2099.24,2194 2034.08,2194 2029.58,2198.5 1978.42,2198.5 1973.92,2194 1891.33,2194 1814,2271.33 1814,2358 1872,2416 1872,2631.53 2071.47,2831 2076.49,2831 2080,2834.51 2080,2863.62 2045,2898.62 2045,2939 2274,3168 2507,3168 2509.98,3165.02 2701,2974 3180.19,2974 3184.19,2978 3342.1,2978 3355.1,2991 3482.19,2991 3490.19,2983 3611.81,2983 3616.45,2978.36 3634.01,2978.36 3642.38,2970 v1(3644,2970)
  L6_HS2 w6: v1(3590.55,2906.46) 3590.55,2907.83 3575.99,2922.39 3575.99,2943.34 3602.66,2970 v1(3644,2970)
NetR39_1: R39.1 U1A.H3 | length 4274.3
  L1_TOP w2: v1(3433.07,2780.47) U1A.H3@3448.04,2765.5
  L1_TOP w6: v1(3258,1975) 3258,2016 3276,2034 3698.75,2034 3711.8,2047.05 3743.07,2047.05 3758.12,2032 3789.38,2032 3791.38,2034 4019,2034 4194,1859 4527.38,1859 4590.38,1922 4768.38,1922 4914.56,2068.17 R39.1@4914.56,2132
  L5_SIG w6: v1(3258,1975) 3409.72,1975 3510.52,2075.81 3722.19,2075.81 3805.06,2158.68 3805.06,2163.65 3757,2211.72 3757,2257.47 3747,2267.47 3747,2294.49 3750.51,2298 3782.47,2298 3785.47,2301 3804.53,2301 3807.53,2298 3829.49,2298 3833,2294.49 3833,2274.14 3875,2232.14 3875,2167.62 3890.62,2152 3914.38,2152 3931.19,2168.81 3931.19,2258.19 3945.02,2272.02 3950.02,2272.02 v1(3965,2287)
  L8_BOTTOM w6: v1(3433.07,2780.47) 3447.92,2765.63 3447.92,2749.7 3465.62,2732 3470.38,2732 3483,2719.38 3483,2674.47 3467,2658.47 3467,2611.83 3477.57,2601.26 3477.57,2554.62 3468.95,2546 3415.51,2546 3412,2542.49 3412,2499.06 3415.51,2495.55 3505.98,2495.55 3523,2478.53 3523,2461.03 3534,2450.03 3534,2397.62 3646.85,2284.76 3729.71,2284.76 3767.47,2247 3803.53,2247 3843.53,2287 v1(3965,2287)
NetR40_1: R40.1 U1A.P15 | length 373.7
  L1_TOP w2: v1(3814,2555) 3814,2564.54 U1A.P15@3825.99,2576.53
  L1_TOP w4: R40.1@3746,2246.44 3746,2266.22 3758.68,2278.9 3763.32,2278.9 3776,2291.58 3776,2295.69 3769.72,2301.97 3769.72,2384.75 3786.29,2401.32 3786.29,2410.78 3800,2424.49 3800,2430.23 3803.13,2433.36 3807.47,2433.36 v1(3808.23,2434.12)
  L6_HS2 w4: v1(3808.23,2434.12) 3808.23,2547.07 3814,2552.84 v1(3814,2555)
NetR41_2: R41.2 U1A.D6 | length 1790.2
  L1_TOP w2: v1(3527.56,2906.46) U1A.D6@3542.53,2891.49
  L1_TOP w4: R41.2@3419,1952.56 3451.56,1952.56 3454.39,1955.39 3454.39,1962.22 3461,1968.84 v1(3461,1971)
  L4_POWER w6: v1(3461,1971) 3488,1971 3648,2131 3648,2173.53 3782.47,2308 3814.38,2308 3822,2315.62 3822,2340.84 3886.53,2405.37 3886.53,2427.4 3870.93,2443 3856.79,2443 3852.79,2447 3852.38,2447 3834.38,2465 3813.62,2465 3800.62,2478 3648.7,2478 3644.7,2482 3494.62,2482 3493.62,2481 3456,2481 3417,2520 3408.85,2520 3386,2542.85 3386,2551 3371.6,2565.4 3371.6,2675.98 3427.62,2732 3468.38,2732 3480,2743.62 3480,2754.38 3464.88,2769.5 3463.12,2769.5 3448,2784.62 3448,2837.38 3450.62,2840 3456.7,2840 3469,2852.3 3469,2858.38 3501.62,2891 3516.38,2891 3524,2898.62 3524,2901.27 3527.56,2904.83 v1(3527.56,2906.46)
NetR42_1: R42.1 SB6.1 SB7.1 SB8.1 U1A.C3 | length 2232.7
  L1_TOP w2: v1(3296,3032) 3388.36,2993.98 3447.34,2940.7 cw(c3446,2939.22) 3447.42,2940.63 3448.04,2940.01 U1A.C3@3448.04,2922.98
  L1_TOP w6: R42.1@3168.56,2954 3168.56,2957.94 3142.78,2983.72 3142.78,3075.93 3151.57,3084.72 3271.67,3084.72 3300,3056.38 3300,3037.62 3296,3033.62 v1(3296,3032) ; v1(3562,3129) 3562,3162.15 3577.72,3177.86 3591.23,3177.86 3595.37,3182 3612.65,3182 3651,3220.35 3651,3264.14 3651,3265.47 3676,3290.47 3676,3303.14 3770,3397.14 3770,3441.83 3959.38,3631.22 4001.2,3631.22 4016,3646.02 4016,3660.16 4036.66,3680.82 4036.66,3746.93 4045.45,3755.72 4056.76,3755.72 4102,3800.95 4102,3841 ; SB6.1@4070,4068 4070,4005.51 4064,3999.51 4064,3879 4102,3841 ; SB8.1@4102,3926 4102,3841 ; SB7.1@4118,3802 4118,3825 4102,3841
  L3_HS1 w6: v1(3296,3032) 3297.15,3030.85 3307.76,3030.85 3310.62,3028 3321.38,3028 3342.38,3049 3425.38,3049 3447,3070.62 3447,3107 3465,3125 3475.77,3125 3490.97,3109.8 3542.8,3109.8 v1(3562,3129)
NetR43_2: R43.2 U1A.N2 | length 3328.6
  L1_TOP w4: U1A.N2@3416.54,2608.02 3424.04,2600.53 3431.47,2600.53 v1(3433,2599)
  L1_TOP w6: R43.2@2502.56,2390 2531,2390 v1(2548,2373)
  L3_HS1 w6: v1(2548,2373) 2272.38,2373 2240.38,2341 2223.62,2341 2086.62,2204 2038.22,2204 2033.73,2208.5 1974.27,2208.5 1969.78,2204 1903,2204 1877,2230 1869.47,2230 1835,2264.47 1835,2350.14 1892,2407.14 1892,2637.38 1918.62,2664 1927.14,2664 2152.14,2889 2416.47,2889 2457.06,2848.41 2462.03,2848.41 2462.62,2849 2473.38,2849 2481,2841.38 2481,2830.62 2480.41,2830.03 2480.41,2825.06 2537.47,2768 2556.53,2768 2593.53,2805 2824.38,2805 2851.38,2832 2908.38,2832 2956.75,2783.64 2956.75,2757.5 2954,2754.76 v1(2954,2727)
  L5_SIG w6: v1(3177.5,2607.5) 3217.88,2607.5 3274,2663.62 3274,2665.38 3299.62,2691 3310.38,2691 3321,2680.38 3321,2567 v1(3343,2545)
  L8_BOTTOM w6: v1(2954,2727) 3002,2679 3106,2679 v1(3177.5,2607.5) ; v1(3343,2545) 3378.47,2545 3432.47,2599 v1(3433,2599)
NetR44_2: R44.2 U1A.P2 | length 1991.1
  L1_TOP w4: v1(3302,2568) 3302.47,2567.53 3388.78,2567.53 3397.78,2576.53 U1A.P2@3416.54,2576.53
  L1_TOP w6: R44.2@2502.56,2341 2551,2341 v1(2563,2353)
  L5_SIG w6: v1(2563,2353) 2674,2464 2758.47,2464 2952.47,2270 2977.53,2270 2991,2283.47 2991,2302.53 2931,2362.53 2931,2370.67 2892.03,2409.64 2891.97,2409.64 2858,2443.62 2858,2516.38 2957.62,2616 2968.38,2616 2990.12,2594.27 2990.12,2486.88 v1(3013,2464)
  L6_HS2 w6: v1(3013,2464) 3194.91,2282.09 v1(3264,2282.09)
  L8_BOTTOM w6: v1(3264,2282.09) 3264,2373.62 3253,2384.62 3253,2395.38 3258,2400.38 3258,2448.38 3302,2492.38 v1(3302,2568)
NetR45_2: R45.2 U1A.R6 | length 4113.1
  L1_TOP w6: R45.2@1058,1841.12 1472.19,1841.12 1482.07,1851 1757.6,1851 1766.38,1859.78 1863.16,1859.78 1934.38,1931 v1(1950,1931) ; v1(3301,2214) 3434.83,2214 3442.25,2206.57 cw(c3438.11,2202.24) 3444.11,2202.24 3444.11,2175 3439.42,2170.32 3439.42,2101.68 3444.11,2097 3512.74,2097 3524.21,2108.46 3546.95,2108.46 3552,2113.51 3552,2178.38 3542,2188.38 3542,2195 3462.14,2274.86 3446.29,2274.86 3442.78,2278.38 3442.78,2331.82 3442.78,2339.62 3446.88,2343.72 3472.34,2343.72 3480.6,2343.72 3485.88,2349 3494.98,2349 3514.98,2369 3610.7,2369 3660.15,2418.45 3660.15,2422.69 3662,2424.54 3662,2427.16 3670,2435.16 3670,2435.85 3677,2442.85 3677,2450.28 3679,2452.28 3679,2461.98 3686,2468.98 3686,2470.41 3686.51,2470.92 3686.51,2489.5 3678,2498.01 3678,2523.09 3674.49,2526.6 3559.93,2526.6 3527.56,2558.97 v1(3527.56,2560)
  L8_BOTTOM w6: v1(1950,1931) 2919.38,1931 2995,2006.62 2995,2373.53 3090.47,2469 3121.67,2469 3126.67,2464 3126.67,2318.19 3248.86,2196 3283,2196 v1(3301,2214)
NetR46_1: R46.1 SB9.1 SB10.1 U1A.D3 | length 5268.8
  L1_TOP w2: v1(3433.07,2906.46) U1A.D3@3448.04,2891.49
  L1_TOP w6: v1(3958,3771) 3945,3784 3945,4024.25 3957.31,4036.56 3957.31,4090.69 3969.62,4103 3993.49,4103 3996.49,4106 4082.51,4106 4085.51,4103 4093,4103 4166.83,4029.17 4171.81,4029.17 4175.32,4032.68 4175.32,4099.18 4237.99,4161.85 4258.93,4161.85 4297.41,4200.33 4297.41,4292.41 4351.25,4346.25 4361.59,4346.25 4446,4430.66 SB9.1@4446,4441 4446,4456 4506,4516 4890.31,4516 4940.44,4465.87 ; SB10.1@4917,4449 4928.66,4460.66 4928.66,4465.87 4940.44,4465.87 ; v1(4955,4445) 4956.15,4446.15 4956.15,4453.29 5335.86,4833 5444.38,4833 5505,4893.62 5505,4904.38 5497.38,4912 5386.57,4912 4940.44,4465.87 ; R46.1@5299.56,3903 v1(5299.56,3952.56)
  L3_HS1 w6: v1(3507,3330.62) 3668.85,3492.47 3668.85,3502.85 v1(3670,3504)
  L6_HS2 w6: v1(3433.07,2906.46) 3450,2923.39 3450,2930.38 3507.62,2988 3523.24,2988 3556.62,3021.37 3556.62,3028 3550.62,3034 3538.62,3034 3530,3042.62 3530,3061.38 3546.24,3077.62 3546.24,3089.57 3552.52,3095.85 3552.52,3097.42 3573.1,3118 3586.49,3118 3590,3121.51 3590,3123.53 3607.99,3141.51 3624.96,3141.51 3628.47,3138 3656.14,3138 3659.65,3141.51 3659.65,3192.16 3645,3206.81 3645,3222.81 3612.91,3254.91 3612.28,3254.91 3580.19,3287 3550.62,3287 v1(3507,3330.62) ; v1(3670,3504) 3691,3504 v1(3958,3771) ; v1(4955,4445) 4997.38,4445 5275,4167.38 5275,4164.62 5302,4137.62 5302,4047.12 5299.56,4044.68 v1(5299.56,3952.56)
NetR47_2: R47.2 U1A.P4 | length 3884.8
  L1_TOP w2: U1A.P4@3479.54,2576.53 3479.54,2578.03 3495,2593.5 v1(3495,2595)
  L1_TOP w6: v1(2927,4022) R47.2@2927,4045.56
  L3_HS1 w6: v1(3319.96,2539.96) 3319.96,2540.35 3351.62,2572 3424.38,2572 3447.38,2595 v1(3495,2595)
  L6_HS2 w6: v1(2685.3,2336) 2636.3,2287 2558.3,2287 2456,2389.3 2456,2584.7 2523.96,2652.66 2768.38,2652.66 2836.34,2720.62 2836.34,2742.16 2773.5,2805 2626.62,2805 2609.52,2822.1 2463.52,2822.1 2437,2848.62 2437,3335.38 2927,3825.38 v1(2927,4022) ; v1(3156,2377.98) 3172,2393.98 3172,2404.67 3233.33,2466 3246,2466 v1(3319.96,2539.96)
  L8_BOTTOM w6: v1(2685.3,2336) 2724.3,2375 2980.53,2375 3100.53,2495 3125.38,2495 3156,2464.38 v1(3156,2377.98)
NetR48_2: R48.2 U1A.T11 | length 1321.1
  L1_TOP w4: v1(2819,2479) 2819,2492.25 2844.28,2517.53 2844.28,2530.78 2856.06,2542.56 R48.2@2860,2542.56 ; U1A.T11@3700.01,2513.54 3719.01,2494.54 3719.01,2460.98 3708,2449.97 3708,2435.99 3715,2428.99 3715,2415 v1(3724,2406)
  L5_SIG w4: v1(2819,2479) 2819.89,2479.89 2819.89,2491 2953.89,2625 2998.89,2625 3210.89,2413 3214.11,2413 3238.11,2389 3245,2389 3256.5,2377.5 3313.77,2377.5 3315.27,2376 3357.82,2376 3373.92,2359.89 3383.86,2359.89 3394.97,2371 3454,2371 3467,2358 3658.32,2358 3689.32,2389 3704.97,2389 3708.97,2393 3711,2393 v1(3724,2406)
NetR49_1: R49.1 SB11.1 SB12.1 U1A.D2 | length 5349.2
  L1_TOP w4: v1(3314,2954) 3372.8,2954 3382.99,2943.81 3403.17,2943.81 3408.54,2938.44 3408.54,2919.67 3416.54,2911.67 U1A.D2@3416.54,2891.49 ; R49.1@3620,1954.12 v1(3620,1990.56) ; v1(3706,3260) 3736,3230 3749.89,3230 4045.66,3525.77 4045.66,3743.2 4049.18,3746.72 4060.49,3746.72 4077.22,3763.45 4252.98,3763.45 4255.33,3765.79 4255.33,3779.33 4273,3797 4273,3930.66 4270.66,3933 4181,3933 4181,3942.27 4190.75,3952.02 4190.75,4013.19 4246.06,4068.5 4254.95,4068.5 4345.04,4158.6 4430.77,4158.6 4529.19,4257.02 4529.19,4317.86 4566.8,4355.47 4660.89,4355.47 4691,4385.58 4691,4435 SB11.1@4685,4441 4723.66,4441 4726,4443.34 v1(4726,4469) ; SB12.1@5048,4347 5048,4383 5068,4403 v1(5068,4435)
  L3_HS1 w4: v1(4726,4469) 5034,4469 v1(5068,4435)
  L4_POWER w4: v1(3314,2954) 3513.4,2954 3529.4,2938 3545.97,2938 3553,2930.97 3553,2921.03 3539.56,2907.59 3539.56,2895.29 3505,2860.73 3505,2859.03 3492.97,2847 3491.03,2847 3482.5,2838.47 3482.5,2807 3489.53,2799.97 3489.53,2771.72 3499,2762.25 3499,2717.97 3508,2708.97 3508,2699.03 3500.97,2692 3480,2692 3476,2696 3455.03,2696 3446.54,2687.51 3446.54,2682.48 3438.04,2673.98 3399.09,2673.98 3390.6,2665.49 3390.6,2576.43 3405,2562.03 3405,2550.72 3416.72,2539 3428.03,2539 3453.03,2514 3486.53,2514 3498.53,2502 3651.57,2502 3654.79,2498.77 3811.8,2498.77 3818.03,2505 3827.97,2505 3829.47,2503.5 3837.3,2503.5 3905.53,2435.27 3905.53,2397.5 3896,2387.97 3896,2362.03 3799.97,2266 3793.69,2266 3711,2183.31 3711,2175.46 3696,2160.46 3696,2152.13 3620,2076.13 v1(3620,1990.56)
  L8_BOTTOM w4: v1(3314,2954) 3316.16,2954 3319.16,2951 3324.14,2955.97 3326.17,2955.97 3342,2971.8 3342,3046.53 3410,3114.53 3450.88,3114.53 3489.41,3076 3509.89,3076 3511.09,3074.8 3529.31,3074.8 3542.2,3087.69 3542.2,3105.91 3524,3124.11 3524,3197.11 3638.89,3312 3657.97,3312 3695.61,3274.36 3695.61,3270.39 v1(3706,3260)
NetR50_2: R50.2 U1A.T13 | length 6510.9
  L1_TOP w4: v1(3759,2430) 3776,2447 3776,2500.54 U1A.T13@3763,2513.54
  L1_TOP w6: v1(3423,4094) 3423,4046.56 R50.2@3424,4045.56
  L4_POWER w6: v1(3423,4094) 3422.62,4094 2959,3630.38 2959,3513.72 3024.74,3447.97 3024.74,3423.21 3008.53,3407 2931.88,3407 2902,3377.12 2902,3368.74 2894,3360.74 2894,3358.01 2893,3357.01 2893,3328.53 2893,3247 2733,3087 2689.51,3087 2686,3090.51 2686,3142.41 2863,3319.41 2863,3381.53 2849.53,3395 2804.28,3395 2791.28,3408 2671.43,3408 2664.43,3415 2633.57,3415 2626.57,3408 2614.72,3408 2493,3286.28 2493,3285.38 2468,3260.38 2468,3248.72 2477.62,3239.09 2477.62,3220.01 2468,3210.38 2468,3199.62 2475.62,3192 2486.38,3192 2513,3218.62 2513,3266.14 2641.86,3395 2656.14,3395 2663.14,3388 2779.49,3388 2814,3353.49 2814,3312.86 2786,3284.86 2786,3270.69 2666,3150.69 2666,2896.57 2676.16,2886.41 2676.16,2697.84 2884,2490 2884,2473.37 2872.63,2462 2843,2462 2838,2457 2838,2440.62 2830.38,2433 2814,2433 2780.7,2399.7 2780.7,2351.37 2784.21,2347.86 2808.49,2347.86 2812,2351.37 2812,2361.38 2819.62,2369 2830.38,2369 2850.38,2349 2898.38,2349 2901.38,2352 2933.53,2352 2937.53,2356 2998.87,2356 3003.98,2350.89 3091.75,2350.89 3221.86,2481 3321.38,2481 3329,2473.38 3329,2449.62 3308.88,2429.5 3213.8,2429.5 3184,2399.7 3184,2382.3 3215.41,2350.89 3470.59,2350.89 3552.7,2433 3581.38,2433 3582.38,2432 3590.38,2432 3605,2417.38 3605,2397.3 3622.3,2380 3622.3,2365.34 3587.47,2330.51 3587.47,2324.14 3569.12,2305.79 3569.12,2184.73 3544.38,2160 3533.62,2160 3519.5,2174.12 3519.5,2177.88 3505.38,2192 3479.27,2192 3439.42,2152.16 3439.42,2119.84 3462.27,2097 3509.66,2097 3564.91,2152.24 3604.83,2192.16 3604.83,2286.53 3655.3,2337 3687.53,2337 3747,2396.47 3747,2397.38 3759,2409.38 v1(3759,2430)
NetR51_1: R51.1 U1A.U9 | length 3947.3
  L1_TOP w6: v1(3484,2394) 3461.72,2371.72 3435.28,2371.72 3412.32,2348.75 3362.2,2348.75 3356.24,2354.72 3322.88,2354.72 3313.53,2345.37 3313.53,2317.12 3318.78,2309.38 3322.88,2305.28 3359.27,2269 3468.76,2247.27 3503.31,2212.72 3503.31,2208.69 v1(3539,2173) ; U1A.U9@3637.02,2482.04 3637.51,2481.55 3637.51,2459.49 v1(3638,2459) ; v1(5964,1883) 5993.28,1853.72 5993.28,1801.18 6013.28,1781.18 6013.28,1777.66 6024.06,1766.88 R51.1@6028,1766.88
  L3_HS1 w6: v1(4078,1496) 4322,1740 4446.72,1740 4489.72,1783 5010.84,1783 5016.84,1777 5581.73,1777 5604.73,1800 5881,1800 v1(5964,1883)
  L5_SIG w6: v1(3484,2394) 3485.62,2394 3491.62,2400 3520.53,2400 3543.53,2423 3548.4,2423 3558.4,2433 3586.62,2433 3593.62,2426 3596.38,2426 3604.9,2417.49 3604.9,2408.72 3620.62,2393 3631.38,2393 3648,2409.62 3648,2416.7 3661.67,2430.36 3661.67,2435.33 v1(3638,2459)
  L8_BOTTOM w6: v1(3539,2173) 3573,2173 3588.74,2157.26 3588.74,2144.69 3784.87,1948.56 3830.83,1948.56 3933,1846.38 3933,1798.53 3946,1785.53 3946,1766.47 3944,1764.47 3944,1689.5 3944,1661.53 4010.43,1595.1 4010.43,1563.57 v1(4078,1496)
NetR52_2: R52.2 U1A.R13 | length 3258.9
  L1_TOP w2: v1(3738.97,2561.03) 3747,2561.03 U1A.R13@3763,2545.03
  L1_TOP w6: v1(3508,4093) 3524,4077 R52.2@3524,4045.56
  L4_POWER w6: v1(3406,3348) 3420,3348 3508,3436 v1(3508,4093) ; v1(3651,2688) 3652.15,2689.15 3659.76,2689.15 3671.62,2701 3682.38,2701 3712.36,2671.02 3780.36,2671.02 3799.38,2652 3831.67,2652 3837.67,2658 3875.27,2658 3888.41,2644.86 3888.41,2629.95 3866.07,2607.62 3856,2607.62 3845.87,2597.49 3845.87,2592.51 3849.38,2589 v1(3850,2589)
  L5_SIG w6: v1(3406,3348) 3406,3314.16 3350,3258.16 3350,3225.84 3390.84,3185 3516.47,3185 3536.47,3165 3608.67,3165 3617.67,3174 3717.33,3174 3741.33,3198 3762.54,3198 3791.32,3226.78 3810.49,3226.78 3814,3230.29 3814,3244.62 3830,3260.62 3830,3348 3836,3354 3929,3354 3940,3343 3940,3199.2 3993.11,3146.1 3996.43,3146.1 4033,3109.53 4033,3090.47 4021.53,3079 3993.47,3079 3978,3063.53 3978,3008.99 3961,2991.99 3961,2980 3853.96,2872.96 3853.96,2847.43 3847.54,2841 3829.38,2841 3820,2831.62 3820,2813.46 3807.54,2801 3798.62,2801 3778,2780.38 3778,2740.62 3749.42,2712.04 3718.58,2712.04 3690,2683.46 3690,2682.62 3682.38,2675 3669.38,2675 3657.53,2686.85 3652.15,2686.85 v1(3651,2688)
  L8_BOTTOM w6: v1(3738.97,2561.03) 3750.38,2549.62 3758.23,2549.62 3771.62,2563 3782.38,2563 3795.77,2549.62 3801,2549.62 3809.62,2541 3848.38,2541 3856,2548.62 3856,2565 3850,2571 v1(3850,2589)
NetR53_1: R53.1 U1A.T9 | length 3623.3
  L1_TOP w4: v1(3634,2443) 3636.16,2443 3640.16,2447 3642.97,2447 3650,2454.03 3650,2500.55 U1A.T9@3637.02,2513.54
  L1_TOP w6: v1(3854,2401) 3872,2383 3872,2302.78 3905.28,2269.5 3905.28,2232.76 3920.66,2217.38 3960.72,2217.38 3984.1,2194 4011.62,2194 4025.62,2208 4036.38,2208 4044,2200.38 4044,2189.73 4043,2188.73 4043,2181.27 4048.27,2176 4069,2176 4079,2186 4079,2223.47 4077,2225.47 4077,2244.53 4079,2246.53 4079,2271 v1(4100.45,2292.45) ; v1(5550,1790) 5550,1807 5561.88,1818.88 R53.1@5620,1818.88
  L3_HS1 w6: v1(4079,1534) 4373,1828 5512,1828 v1(5550,1790)
  L8_BOTTOM w6: v1(3634,2443) 3635.62,2443 3638.62,2446 3643.38,2446 3651,2453.62 3651,2460 3684,2493 3786.9,2493 3809.9,2470 3836.37,2470 3857.37,2491 3869.1,2491 3871.1,2493 3885.33,2493 3927.33,2451 3939.38,2451 3953,2437.38 3953,2426.62 3945.38,2419 3903.04,2419 3881.89,2397.85 3864.16,2397.85 3862.16,2399.85 3855.15,2399.85 v1(3854,2401) ; v1(4079,1534) 4114,1569 4114,2203 4136,2225 4136,2256.89 v1(4100.45,2292.45)